# Altium PCB Control.PcbDoc (part 1 of 2)
Units mm, origin at the board's own origin, x right, y up, seen from the top; angles counter-clockwise.
Board outline 30.5 x 82 mm, 2 copper layers (Top Layer, Bottom Layer), stack 1.071 mm thick; 79 components, 65 nets, 365 pads, 467 vias.
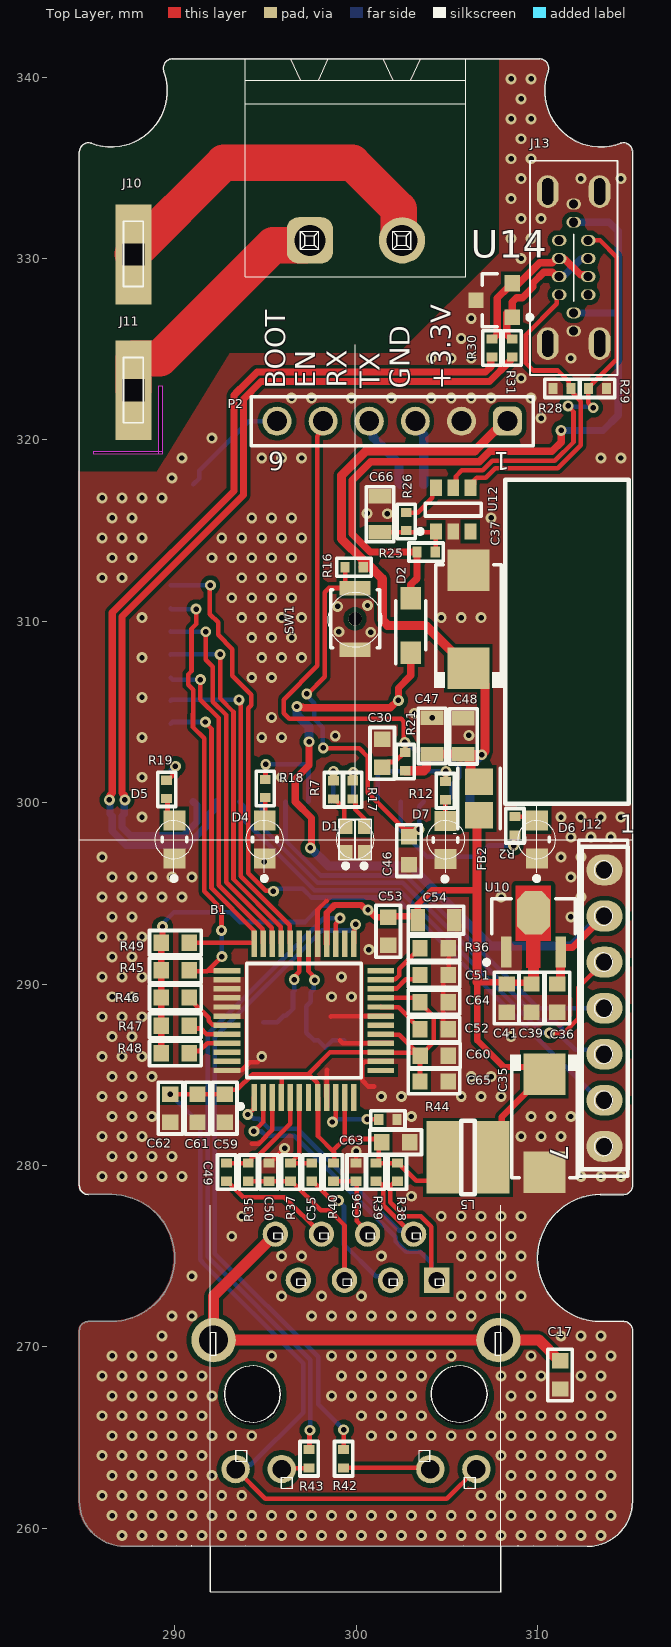
[diagram p0: Top Layer view]
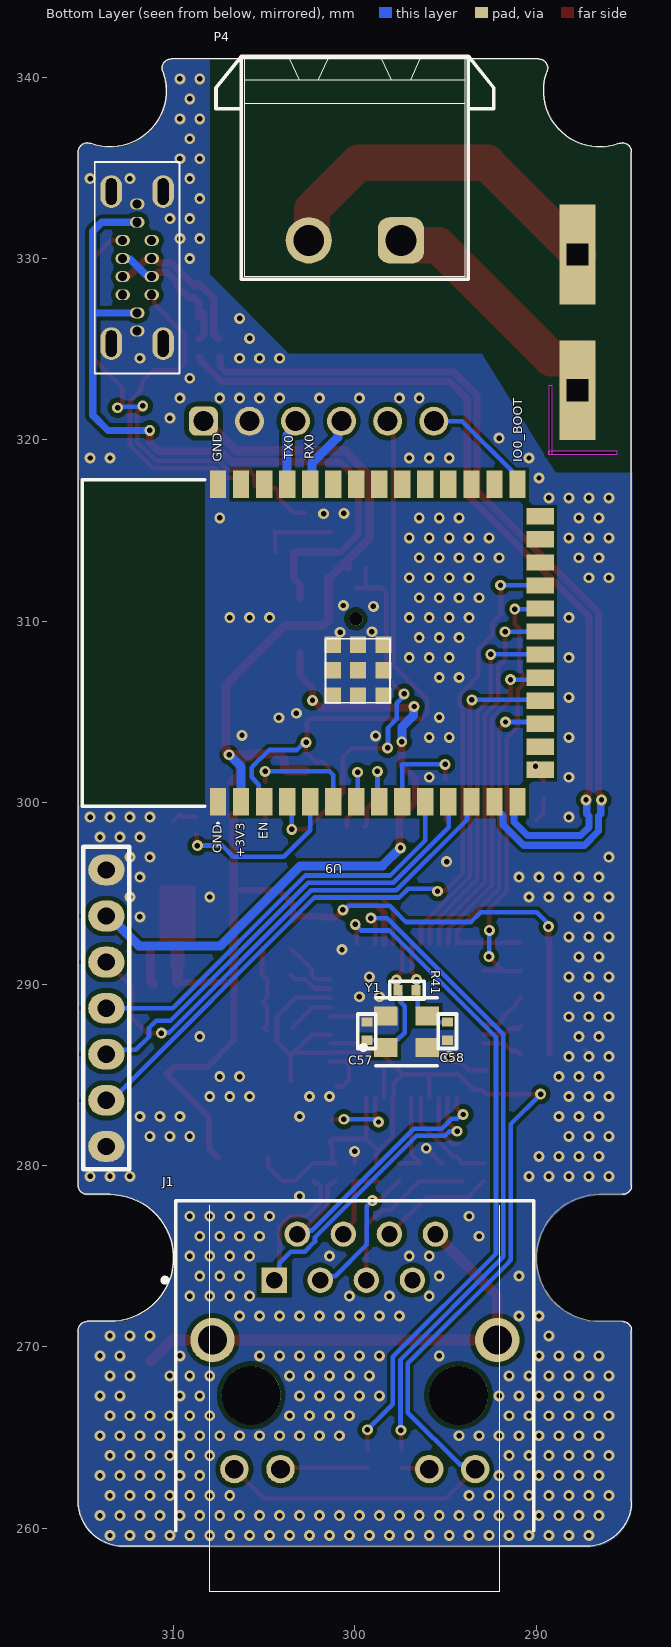
[diagram p1: Bottom Layer view, seen from below]
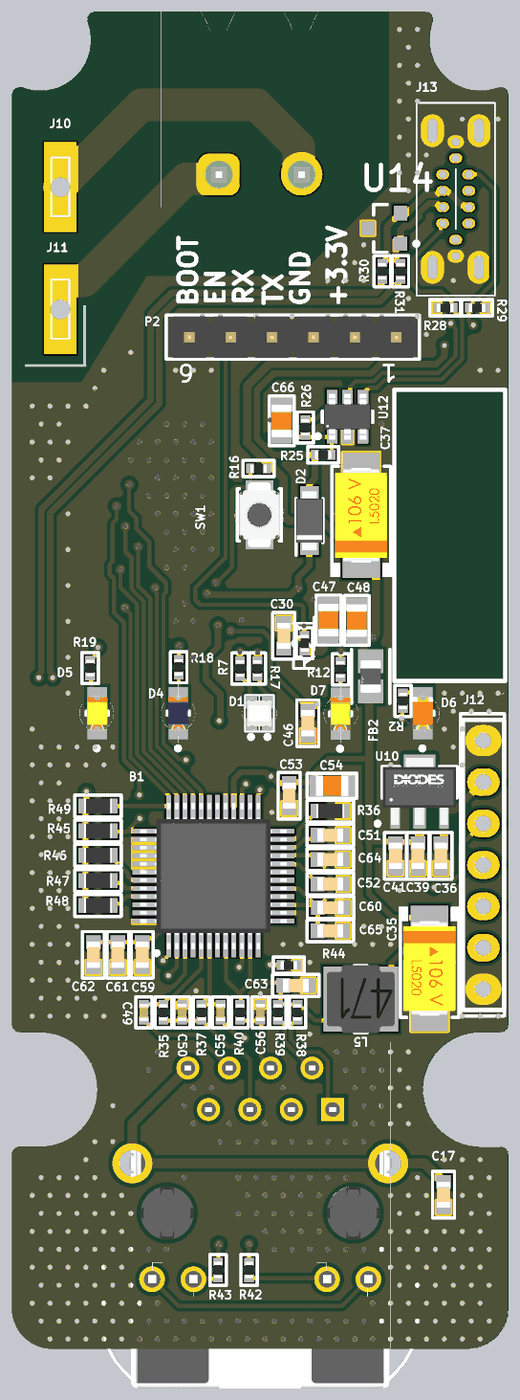
[diagram p3: 3D render of the assembled board from above, using the file's embedded part models]
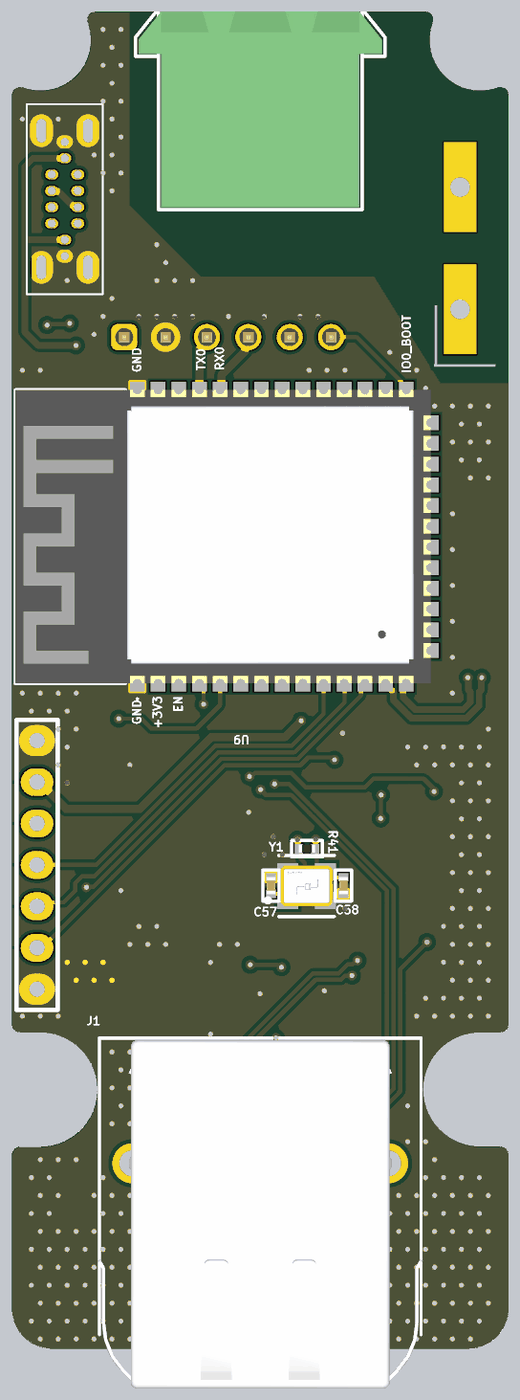
[diagram p4: 3D render of the assembled board from below, using the file's embedded part models]

## Layer stack, top to bottom
Top Solder: solder mask 0.0102, Solder Resist, Dk 3.5
Top Layer: signal copper 0.0356
Dielectric 1: dielectric 1, FR-4, Dk 4.8
Bottom Layer: signal copper 0.0356
Bottom Solder: solder mask 0.0102, Solder Resist, Dk 3.5

## Board outline
284.75,270.9 cw(c285.25,270.9) 285.25,271.4 286.5,271.4 ccw(c286.5,274.9) 286.5,278.4 285.25,278.4 cw(c285.25,278.9) 284.75,278.9 284.75,335.874 cw(c285.25,335.874) 285.424,336.343 ccw(c286.5,339.25) 289.407,340.326 cw(c289.876,340.5) 289.876,341 310.124,341 cw(c310.124,340.5) 310.593,340.326 ccw(c313.5,339.25) 314.576,336.343 cw(c314.75,335.874) 315.25,335.874 315.25,278.9 cw(c314.75,278.9) 314.75,278.4 313.5,278.4 ccw(c313.5,274.9) 313.5,271.4 314.75,271.4 cw(c314.75,270.9) 315.25,270.9 315.25,261.5 cw(c312.75,261.5) 312.75,259 287.25,259 cw(c287.25,261.5) 284.75,261.5
cut-out: 289.331,319.203 285.548,319.203 285.548,319.38 289.331,319.38
cut-out: 289.129,319.203 289.129,322.986 289.306,322.986 289.306,319.203

## Design rules (kind name [scope] priority, off if disabled: settings)
Clearance Clearance_DiffPairs [All] p1: gap=0.254 ignorepadtopadclearanceinfootprint=FALSE except(0.1: Arc-Arc Arc-Track Track-Track; 0.15: Arc-SMDPad Arc-THPad Track-SMDPad Track-THPad SMDPad-SMDPad; 0.2: Arc-Fill Arc-Poly Arc-Region Track-Fill Track-Poly Track-Region SMDPad-Fill SMDPad-Poly SMDPad-Region)
Clearance Clearance_1 [All] p2: gap=0.254 ignorepadtopadclearanceinfootprint=FALSE except(0.15: Arc-Arc Arc-Track Arc-SMDPad Arc-THPad Track-Track Track-SMDPad Track-THPad SMDPad-SMDPad; 0.2: Arc-Fill Arc-Poly Arc-Region Track-Fill Track-Poly Track-Region SMDPad-Fill SMDPad-Poly SMDPad-Region)
ComponentClearance [All] p1: gap=-10 collisioncheckmode=3 verticalgap=0.254 showdistances=FALSE
DiffPairsRouting DiffPairsRouting_2 [InDifferentialPair('TX')] p1: maxlimit=0.127 minlimit=0.127 mostfreqgap=0.127 toplayer_minwidth=0.257 toplayer_maxwidth=0.257 toplayer_prefwidth=0.257 bottomlayer_minwidth=0.257 bottomlayer_maxwidth=0.257 bottomlayer_prefwidth=0.257 impedanceprofiledriven=TRUE impedanceprofileid={17FF99D6-841A-44A6-B72D-4877BCBBE8D0} impedanceprofilevalue=100.000000 maxuncoupledlength=12.7
DiffPairsRouting DiffPairsRouting_1 [InDifferentialPair('D')] p2: maxlimit=0.127 minlimit=0.127 mostfreqgap=0.127 toplayer_minwidth=0.403 toplayer_maxwidth=0.403 toplayer_prefwidth=0.403 bottomlayer_minwidth=0.403 bottomlayer_maxwidth=0.403 bottomlayer_prefwidth=0.403 impedanceprofiledriven=TRUE impedanceprofileid={67F76D44-EA98-4726-9E93-E288EFCD1E18} impedanceprofilevalue=90.000000 maxuncoupledlength=12.7
DiffPairsRouting [InDifferentialPair('USB_D')] p3: maxlimit=0.127 minlimit=0.127 mostfreqgap=0.127 toplayer_minwidth=0.403 toplayer_maxwidth=0.403 toplayer_prefwidth=0.403 bottomlayer_minwidth=0.403 bottomlayer_maxwidth=0.403 bottomlayer_prefwidth=0.403 impedanceprofiledriven=TRUE impedanceprofileid={67F76D44-EA98-4726-9E93-E288EFCD1E18} impedanceprofilevalue=90.000000 maxuncoupledlength=12.7
HoleSize [All] p1: absolutevalues=TRUE maxlimit=4 minlimit=0.025 maxpercent=80.000 minpercent=20.000
Length USB_Max_Lenght [InNet('D_P')] p1: maxlimit=100 minlimit=0
MatchedLengths USB [InDifferentialPair('USB_D')] p1: tolerance=25.4 checknetsindiffpair=FALSE checkdiffpairvsdiffpair=TRUE checkxsignals=TRUE checkothers=TRUE
MinimumSolderMaskSliver [All] p1: minsoldermaskwidth=0.15
PlaneClearance [All] p1: clearance=0.25
PlaneConnect [All] p1: planeconnectstyle=Direct reliefexpansion=0.508 reliefentries=4 reliefconductorwidth=0.254 reliefairgap=0.254
PolygonConnect [All] p1: connectstyle=Direct reliefconductorwidth=0.254 reliefentries=4 polygonreliefangle="90 Angle" airgapwidth=0.254
RoutingVias [All] p1: holewidth=0.3 width=0.6 viastyle="Through Hole" minholewidth=0.3 minwidth=0.6 maxholewidth=0.4 maxwidth=0.8
SilkToSilkClearance [All] p1: silktosilkclearance=0.1
SilkToSolderMaskClearance [IsPad] p1: minsilkscreentomaskgap=0.1 clearancetoexposedcopper=TRUE
SolderMaskExpansion [All] p1: expansion=0.102 istentingtop=FALSE
SupplyNets "Schematic Supply Nets_2" [InNet('V_BUS')] p1: voltage=0.000
SupplyNets "Schematic Supply Nets_12" [InNet('G')] p2: voltage=0.000
SupplyNets "Schematic Supply Nets_11" [InNet('+3v3')] p3: voltage=0.000
SupplyNets "Schematic Supply Nets_10" [InNet('VCC_2')] p4: voltage=0.000
SupplyNets "Schematic Supply Nets_7" [InNet('+3V3_MCU')] p5: voltage=0.000
SupplyNets "Schematic Supply Nets_6" [InNet('GND_PE')] p6: voltage=0.000
Width [All] p1: maxlimit=2 minlimit=0.254 preferedwidth=0.5 minimp=50.000000 maximp=50.000000 favimp=50.000000
22 further rules are at their usual default settings.

## Classes and differential pairs
differential pair RXN: +RXN_P -RXN_N
differential pair D: +D_P -D_N
differential pair USB_D: +USB_D_P -USB_D_N
differential pair TX: +TX_P -TX_N
differential pair RX: +RX_P -RX_N

## Components (designator, comment, footprint, x,y, rotation, side; value= is the part's Value field where it differs from the comment)
B1 "W5500" QFP50P900X900X160-48N 297.129,287.985 r90 top
C17 "22nF" CAP-0603 311.252,268.453 r90 top
C30 "2.2uF" CAP-0603 301.447,302.717 r270 top
C35 "100uF 16V" CAP-TAN-C 310.388,282.321 r270 top
C36 "0.1uF" CAP-0603 311.099,289.23 r90 top
C37 "100uF_16V" CAP-TAN-C 306.2,310.109 r90 top
C39 "2.2uF" CAP-0603 309.677,289.23 r90 top
C41 "0.1uF" CAP-0603 308.305,289.23 r90 top
C46 "0.1uF" CAP-0603 302.92,297.358 r90 top
C47 "10uF" CAP-0805 304.19,303.682 r270 top
C48 "0.1uF" CAP-0805 305.918,303.657 r270 top
C49 "6.8nF" CAP-0402 292.862,279.629 r90 top
C50 "10nF" CAP-0402 295.199,279.629 r270 top
C51 "10nF" CAP-0603 304.303,290.5 r0 top locked
C52 "4.7uF" CAP-0603 304.303,287.505 r0 top locked
C53 "0.1uF" CAP-0603 301.777,292.913 r90 top
C54 "10uF" CAP-0805 304.409,293.523 r180 top
C55 "6.8nF" CAP-0402 297.561,279.629 r90 top
C56 "22nF" CAP-0402 299.999,279.629 r270 top
C57 "18pF" CAP-0402 299.339,287.401 r270 bottom
C58 "18pF" CAP-0402 294.894,287.401 r90 bottom
C59 "0.1uF" CAP-0603 292.76,283.159 r90 top
C60 "0.1uF" CAP-0603 304.317,286.055 r180 top
C61 "0.1uF" CAP-0603 291.262,283.159 r90 top
C62 "0.1uF" CAP-0603 289.763,283.159 r90 top
C63 "0.1uF" CAP-0603 302.184,281.28 r180 top
C64 "0.1uF" CAP-0603 304.303,289.001 r180 top locked
C65 "10uF" CAP-0603 304.303,284.632 r180 top locked
C66 "1uF 50V" CAP-0805 301.32,315.9 r270 top
D1 "1615 RED-GREEN" LED_Bicolor_1615 299.949,297.967 r0 top
D2 "MBR140SFT1G" SODFL3616X98N 303.022,309.778 r90 top
D4 "LED BLUE" LED_BLUE 294.97,297.967 r90 top
D5 "LED YELLOW" LED_YELLOW 289.992,297.967 r90 top
D6 "LED RED" LED_RED 309.982,297.967 r90 top
D7 "LED GREEN" LED_GREEN 304.927,297.942 r90 top
FB2 "BLM21PG221SN1D" FP-BLM21-0_2-t0_85-e0_5-IPC_A 306.781,300.228 r270 top
J1 "HR911105A" RJ-45 300,267.25 r180 bottom locked
J10 "1.2x3.7mm" Pad_conn_1.2x3.7mm#1 287.68,330.251 r90 top locked
J11 "1.2x3.7mm" Pad_conn_1.2x3.7mm#2 287.655,322.707 r90 top locked
J12 "2.54 x 7_male_25mm" 2.54_Connector_x7_male_30mm 313.7,288.671 r270 top locked
J13 "Type-C_16p" "Type-C 16p vertical" 312,329.5 r90 top locked
L5 "33uH" Coil_4.5x4.5_mm 306.172,280.441 r180 top
P2 "61300611121" 61300611121 302,321.031 r180 top
P4 "691305540002" 691305540002 300,335 r0 bottom locked
R2 "330" RES-0402 308.762,298.729 r270 top
R7 "330" RES-0402 298.755,300.711 r90 top
R12 "330" RES-0402 304.927,300.66 r90 top
R16 "10K" RES-0402 299.898,312.979 r0 top
R17 "330" RES-0402 299.822,300.711 r90 top
R18 "330" RES-0402 294.996,300.787 r90 top
R19 "330" RES-0402 289.56,300.736 r90 top
R21 "100K" RES-0402 302.717,302.26 r270 top
R25 "1K" RES-0402 303.868,313.817 r0 top
R26 "20K" RES-0402 302.768,315.493 r90 top
R28 "5.1K" RES-0402 311.353,322.834 r180 top
R29 "5.1K" RES-0402 313.309,322.834 r0 top
R30 "22R" RES-0402 307.492,325.069 r90 top
R31 "22R" RES-0402 308.61,325.069 r90 top
R35 "82R 1%" RES-0402 294.056,279.629 r270 top
R36 "10K" RES-0603 304.303,291.973 r0 top locked
R37 "82R 1%" RES-0402 296.393,279.629 r90 top
R38 "50R 1%" RES-0402 302.285,279.629 r90 top
R39 "50R 1%" RES-0402 301.092,279.629 r90 top
R40 "10R 1%" RES-0402 298.755,279.629 r270 top
R41 "1M" RES-0402 297.129,289.662 r0 bottom
R42 "510" RES-0402 299.314,263.83 r90 top
R43 "510" RES-0402 297.409,263.83 r90 top
R44 "12.4К" RES-0402 301.752,282.524 r180 top
R45 "10K" RES-0603 290.043,290.754 r0 top
R46 "10K" RES-0603 290.043,289.255 r0 top
R47 "10K" RES-0603 290.043,287.706 r0 top
R48 "10K" RES-0603 290.043,286.182 r0 top
R49 "10K" RES-0603 290.043,292.278 r0 top
SW1 "B3U-1000P" FP-B3U-1000P-B-MFG 299.949,310.134 r270 top
U9 "ESP32-S3_WROOM-1  N16R8" ESP32S3WROOM1N16R8 302.283,308.8 r90 bottom locked
U10 "AMS1117-3.3" SOT-89 309.778,293.548 r0 top
U12 "CH221K" SOT-23-6 305.359,316.154 r90 top
U14 "PESD5V0S2BT" PRKT-SOT23-3_V 307.61,327.702 r180 top
Y1 "ABM8-25.000MHZ-D1X-T" FP-ABM8 297.155,287.376 r180 bottom

## Footprints (in the part's own frame and the unit in brackets; to place one, negate y for a bottom-side part, rotate by r counter-clockwise, add the part's x,y. Pads: shape width x height; smd on the part's side, far side on the other; paste and mask are expansions set on the pad)
2.54_Connector_x7_male_30mm [mm] "2.54_Connector_x7_male_30mm"
  oval 1.7x2 hole 0.95: 1(-7.62,0) 2(-5.08,0) 3(-2.54,0) 4(0,0) 5(2.54,0) 6(5.08,0) 7(7.62,0)
  silkscreen extent -8.89,-1.27 8.89,1.27, body extent -8.89,-1.27 8.89,1.27, height 2
61300611121 [mm] "Pin Header, pitch 2.54 mm, THT, Vertical, single row, 6p"
  rrect50% 1.6x1.6 hole 1.1: 1(-6.35,0)
  round 1.6 hole 1.1: 2(-3.81,0) 3(-1.27,0) 4(1.27,0) 5(3.81,0) 6(6.35,0)
  silkscreen extent -7.77,-1.35 7.77,1.35, body extent -7.62,-1.27 7.62,1.27, height 8.57
691305540002 [mm] "5,08mm - PCB Header Horizontal Entry with Plastic Latches - 02p"
  rrect50% 2.55x2.55 hole 1.7: 1(-2.54,4)
  round 2.55 hole 1.7: 2(2.54,4)
  silkscreen extent -7.65,-6.15 7.65,6.15, body extent -7.48,-6 7.48,6, height 8.63
CAP-0402 [mm]
  rect 0.5x0.6 smd: 1(-0.5,0) 2(0.5,0)
  silkscreen extent -0.95,-0.5 0.95,0.5, body extent -0.52,-0.27 0.53,0.28, height 0.55
CAP-0603 [mm]
  rect 0.85x0.9 smd: 1(-0.775,0) 2(0.775,0)
  silkscreen extent -1.43,-0.67 1.43,0.67, body extent -0.8,-0.4 0.8,0.4, height 0.8
CAP-0805 [mm]
  rect 0.8x1.25 smd mask+0.015: 1(-1,0) 2(1,0)
  silkscreen extent -1.52,-0.76 1.52,0.76, body extent -1,-0.62 1,0.63, height 0.8
CAP-TAN-C [mm]
  rect 2.3x2.3 smd: 1(-2.7,0) 2(2.7,0)
  silkscreen extent -3.8,-1.9 3,1.9, body extent -2.9,-1.6 2.9,1.6, height 2.6
Coil_4.5x4.5_mm [mm]
  rect 1.8x4 smd: 1(-1.397,0) 2(1.397,0)
  silkscreen extent -0.38,-2.03 0.38,2.03, body extent -2.07,-2.07 2.07,2.07, height 2.8
ESP32S3WROOM1N16R8 [mm]
  rect 1.5x0.9 smd: 1(-8.75,5.26) 2(-8.75,3.99) 3(-8.75,2.72) 4(-8.75,1.45) 5(-8.75,0.18) 6(-8.75,-1.09) 7(-8.75,-2.36) 8(-8.75,-3.63) 9(-8.75,-4.9) 10(-8.75,-6.17) 11(-8.75,-7.44) 12(-8.75,-8.71) 13(-8.75,-9.98) 14(-8.75,-11.25) 27(8.75,-11.25) 28(8.75,-9.98) 29(8.75,-8.71) 30(8.75,-7.44) 31(8.75,-6.17) 32(8.75,-4.9) 33(8.75,-3.63) 34(8.75,-2.36) 35(8.75,-1.09) 36(8.75,0.18) 37(8.75,1.45) 38(8.75,2.72) 39(8.75,3.99) 40(8.75,5.26)
  rect 0.9x1.5 smd: 15(-6.985,-12.5) 16(-5.715,-12.5) 17(-4.445,-12.5) 18(-3.175,-12.5) 19(-1.905,-12.5) 20(-0.635,-12.5) 21(0.635,-12.5) 22(1.905,-12.5) 23(3.175,-12.5) 24(4.445,-12.5) 25(5.715,-12.5) 26(6.985,-12.5)
  rect 0.9x0.9 smd: 41(-1.5,-2.46) 42(-2.9,-1.06) 43(-2.9,-2.46) 44(-2.9,-3.86) 45(-1.5,-3.86) 46(-0.1,-3.86) 47(-0.1,-2.46) 48(-0.1,-1.06) 49(-1.5,-1.06)
  silkscreen extent -10,5.21 9,12.75, body extent -9,-12.75 9,12.75, height 3.25
FP-ABM8 [mm] "FP-ABM8"
  rect 1.3x1.05 smd paste+0 mask+0: 1(-1.15,-0.875) 2(1.15,-0.875) 3(1.15,0.875) 4(-1.15,0.875)
  silkscreen extent -2.5,-1.88 1.7,1.88, body extent -1.6,-1.25 1.6,1.25, height 0.8
FP-B3U-1000P-B-MFG [mm]
  rect 0.8x1.7 smd paste+0 mask+0: 1(-1.7,0) 2(1.7,0)
  round 0.75 hole 0.75 unplated paste-2539.97 mask+0: ""(0,0)
  silkscreen extent -1.6,-1.35 1.6,1.35, body extent -2.2,-1.45 2.2,1.45, height 0.25
FP-BLM21-0_2-t0_85-e0_5-IPC_A [mm]
  rect 1.455x1.556 smd paste+0 mask+0: 1(-0.926,0) 2(0.926,0)
  silkscreen extent -1.65,-1.18 1.65,1.18, body extent -1,-0.63 1,0.63, height 1.05
LED_Bicolor_1615 [mm] "LED_Bicolor_1615"
  rect 0.7x0.8 smd mask+0: 1(-0.5,0.7) 2(0.5,0.7) 3(0.5,-0.7) 4(-0.5,-0.7)
  silkscreen extent -0.89,-1.57 0.89,1.12, body extent -0.75,-0.8 0.75,0.8, height 0.55
LED_BLUE [mm]
  rect 1.1x1.2 smd paste+0 mask+0: 1(1.05,0) 2(-1.05,0)
  silkscreen extent -2.27,-0.67 0.13,0.67, body extent -1,-0.63 1,0.63, height 0.8
LED_GREEN [mm]
  rect 1.1x1.2 smd paste+0 mask+0: 1(1.05,0) 2(-1.05,0)
  silkscreen extent -2.27,-0.67 0.13,0.67, body extent -1,-0.63 1,0.63, height 0.8
LED_RED [mm]
  rect 1.1x1.2 smd paste+0 mask+0: 1(1.05,0) 2(-1.05,0)
  silkscreen extent -2.27,-0.67 0.13,0.67, body extent -1.7,-0.77 1.7,0.77, height 0.25
LED_YELLOW [mm]
  rect 1.1x1.2 smd paste+0 mask+0: 1(1.05,0) 2(-1.05,0)
  silkscreen extent -2.27,-0.67 0.13,0.67, body extent -1,-0.63 1,0.63, height 0.8
Pad_conn_1.2x3.7mm#1 [mm]
  rect 5.5x2 hole 1.2 square: 1(-0.025,-0.051)
Pad_conn_1.2x3.7mm#2 [mm]
  rect 5.5x2 hole 1.2 square: 1(0.026,-0.076)
PRKT-SOT23-3_V [mm] "SOT23, 3-Leads, Body 2.92x1.3mm, Pitch 0.94mm"
  rect 0.84x0.84 smd: 1(-1,0.94) 3(1,0)
  rect 0.84x0.9 smd: 2(-1,-0.94)
  silkscreen extent -2.09,-1.46 0.65,1.46, body extent -0.65,-1.46 0.65,1.46, height 1.17
QFP50P900X900X160-48N [mm]
  rect 1.475x0.3 smd: 1(-4.238,2.75) 2(-4.238,2.25) 3(-4.238,1.75) 4(-4.238,1.25) 5(-4.238,0.75) 6(-4.238,0.25) 7(-4.238,-0.25) 8(-4.238,-0.75) 9(-4.238,-1.25) 10(-4.238,-1.75) 11(-4.238,-2.25) 12(-4.238,-2.75) 25(4.238,-2.75) 26(4.238,-2.25) 27(4.238,-1.75) 28(4.238,-1.25) 29(4.238,-0.75) 30(4.238,-0.25) 31(4.238,0.25) 32(4.238,0.75) 33(4.238,1.25) 34(4.238,1.75) 35(4.238,2.25) 36(4.238,2.75)
  rect 0.3x1.475 smd: 13(-2.75,-4.238) 14(-2.25,-4.238) 15(-1.75,-4.238) 16(-1.25,-4.238) 17(-0.75,-4.238) 18(-0.25,-4.238) 19(0.25,-4.238) 20(0.75,-4.238) 21(1.25,-4.238) 22(1.75,-4.238) 23(2.25,-4.238) 24(2.75,-4.238) 37(2.75,4.238) 38(2.25,4.238) 39(1.75,4.238) 40(1.25,4.238) 41(0.75,4.238) 42(0.25,4.238) 43(-0.25,4.238) 44(-0.75,4.238) 45(-1.25,4.238) 46(-1.75,4.238) 47(-2.25,4.238) 48(-2.75,4.238)
  silkscreen extent -4.85,-3.15 3.15,3.62, body extent -4.5,-4.5 4.5,4.5, height 1.6
RES-0402 [mm]
  rect 0.5x0.6 smd: 1(-0.5,0) 2(0.5,0)
  silkscreen extent -0.95,-0.5 0.95,0.5, body extent -0.5,-0.25 0.5,0.25, height 0.35
RES-0603 [mm]
  rect 0.85x0.9 smd: 1(-0.775,0) 2(0.775,0)
  silkscreen extent -1.43,-0.67 1.43,0.67, body extent -0.85,-0.45 0.85,0.45, height 0.55
RJ-45 [mm] "RJ-45  connector"
  rect 1.4x1.4 hole 0.9 paste-2539.97 mask+0: 1(-4.445,6.425)
  round 1.4 hole 0.9 paste-2539.97 mask+0: 2(-3.175,8.965) 3(-1.905,6.425) 4(-0.635,8.965) 5(0.635,6.425) 6(1.905,8.965) 7(3.175,6.425) 8(4.445,8.965)
  round 1.57 hole 1.02 paste-2539.97 mask+0: 9(-6.64,-3.985) 10(-4.1,-3.985) 11(4.1,-3.985) 12(6.64,-3.985)
  round 2.45 hole 1.6 paste-2539.97 mask+0: 13(-7.85,3.125) 14(7.85,3.125)
  round 3.25 hole 3.25 unplated paste-2539.97 mask+0: ""(-5.715,0.075) ""(5.715,0.075)
  silkscreen extent -10.6,-7.37 9.87,10.8, body extent -10,-10.68 10,10.68, height 15.75
SODFL3616X98N [mm]
  rect 1.24x1.12 smd: 1(-1.5,0) 2(1.5,0)
  silkscreen extent -2.12,-0.82 1.35,0.82, body extent -1.8,-0.82 1.8,0.82, height 0.98
SOT-23-6 [mm] "SOT-23-6"
  rect 0.9x0.65 smd: 1(-1.2,0.95) 2(-1.2,0) 3(-1.2,-0.95) 4(1.2,-0.95) 5(1.2,0) 6(1.2,0.95)
  silkscreen extent -1.32,-1.55 0.35,1.95, body extent -1.4,-1.45 1.4,1.45, height 1.2
SOT-89 [mm]
  rect 0.58x1.73 smd paste+0 mask+0: 1(-1.5,-1.781) 3(1.5,-1.781)
  oct 1.827x2.394 smd paste+0 mask+0: 2(0,0.381)
  Top Layer region: -0.38,-2.646 -0.38,-1.146 -0.967,-1.146 -0.967,1.884 0.967,1.884 0.967,-1.146 0.38,-1.146 0.38,-2.646
  silkscreen extent -2.7,-2.47 2.3,1.15, body extent -2.4,-2.75 2.4,1.98, height 0.25
"Type-C 16p vertical" [mm] "Type-C 16p vertical"
  oval 0.6x0.8 hole 0.5: A1/B12(-3.5,0) A4/B9(-2.5,0) A5(-1.5,0.8) A6(-0.5,0.8) A7(0.5,0.8) A8(1.5,0.8) A12/B1(3.5,0) B4/A9(2.5,0) B5(1.5,-0.8) B6(0.5,-0.8) B7(-0.5,-0.8) B8(-1.5,-0.8)
  oval 1.8x1.2 hole 0.6 slot 1.462 at 0 deg: MNT1(-4.191,1.43) MNT2(-4.191,-1.43) MNT3(4.191,-1.43) MNT4(4.191,1.43)
  silkscreen extent -5.92,-2.41 5.89,2.41, body extent -6,-2.5 6,2.5, height 13.7

## Part data
B1: "Ethernet ICs 3in1 Enet Controller TCP/IP +MAC+PHY", Manufacturer_Name="Wiznet Technology", Arrow Part Number=W5500, Arrow Price/Stock=https://www.arrow.com/en/products/w5500/wiznet?utm_currency=USD&region=nac, Datasheet Link=https://docs.wiznet.io/img/products/w5500/W5500_ds_v110e.pdf, Geometry.Height=1.6mm, Manufacturer_Part_Number=W5500
C17 C30 C39 C41 C46 C47 C48 C49 C50 C51 C52 C53 C54 C55 C56 C57 C58 C59 C60 C61 C62 C63 C64 C65 C66: library part CAP-NON-POLAR
C35: library part CAP-POLAR, "100uF 16V  size-C"
C36: library part CAP-NON-POLAR, "0.1uF 16V"
C37: library part CAP_POL_SMD, "100uF_16V  size-C"
D1: library part "LED Bicolor", "1615 bicolor SMD LED 2 colors Red+GREEN /  / DY-S161506URUGC-T10-4T-03"
D2: "MBR140SFT1G / DIODE SCHOTTKY 40V 1A SOD123L"
D4: library part LED, "XL-2012UBC XINGLIGHT 0805 LED BLUE", Manufacturer_Name="Wurth Elektronik", Manufacturer_Part_Number=151031YS06000, Mouser Part Number=710-151031YS06000, Datasheet Link=https://katalog.we-online.de/led/datasheet/151031YS06000.pdf, Geometry.Height=5.5mm, Mouser Price/Stock=https://www.mouser.co.uk/ProductDetail/Wurth-Elektronik/151031YS06000?qs=LlUlMxKIyB3xSYYW%252BcuBiQ%3D%3D
D5: library part LED, "XL-2012UYC  XINGLIGHT 0805 LED YELLOW", Manufacturer_Name="Wurth Elektronik", Manufacturer_Part_Number=151031YS06000, Mouser Part Number=710-151031YS06000, Datasheet Link=https://katalog.we-online.de/led/datasheet/151031YS06000.pdf, Geometry.Height=5.5mm, Mouser Price/Stock=https://www.mouser.co.uk/ProductDetail/Wurth-Elektronik/151031YS06000?qs=LlUlMxKIyB3xSYYW%252BcuBiQ%3D%3D
D6: library part LED, "XL-2012SURC   XINGLIGHT  0805  LED RED", Manufacturer_Name="Wurth Elektronik", Manufacturer_Part_Number=151031YS06000, Mouser Part Number=710-151031YS06000, Datasheet Link=https://katalog.we-online.de/led/datasheet/151031YS06000.pdf, Geometry.Height=5.5mm, Mouser Price/Stock=https://www.mouser.co.uk/ProductDetail/Wurth-Elektronik/151031YS06000?qs=LlUlMxKIyB3xSYYW%252BcuBiQ%3D%3D
D7: library part LED, "XL-2012SYGC-06  XINGLIGHT  0805  LED GREEN", Manufacturer_Name="Wurth Elektronik", Manufacturer_Part_Number=151031YS06000, Mouser Part Number=710-151031YS06000, Datasheet Link=https://katalog.we-online.de/led/datasheet/151031YS06000.pdf, Geometry.Height=5.5mm, Mouser Price/Stock=https://www.mouser.co.uk/ProductDetail/Wurth-Elektronik/151031YS06000?qs=LlUlMxKIyB3xSYYW%252BcuBiQ%3D%3D
FB2: "Chip Ferrite Bead, 0805, 220Ω @ 100MHz, 0.045Ω, 25%, 2A"
J1: library part HRK1-1B72F09
J10 J11: library part Klema_15_A
J12: library part 2.54_Connector_x7_male_25mm, "2.54_Connector_x7_male_25mm"
J13: "Type-C_16p  TYPE-C16P female socket vertical plug-in patch 8.8 mm  /  / https://www.aliexpress.com/item/1005012731556882.html?spm=a2g0o.cart.0.0.a5d038da7FoSd6&mp=1&pdp_npi=6%40dis%21UAH%21UAH+257.01%21UAH+231.29%21%21UAH+223.44%21%21%21%402103842a17955063158303339e1049%2112000059158355455%21ct%21UA%214339914066%21%211%210%21"
L5: library part Coil
P2: "WR-PHD Pin Header, THT, Vertical, pitch 2.54mm, 1 Row, 6P", Contact Resistance=20mΩ, Manufacturer="Wurth Elektronik", Operating Temperature Max=105°C, Operating Temperature Min=-40°C, Rated Current=3A, Withstanding Voltage=500V, Working Voltage=250V, Category="Board-to-Board Connectors", ComponentLink1Description="Website Link", ComponentLink1URL=https://www.we-online.com/redexpert/article/61300611121?ad, ComponentLink2Description="Datasheet Link", ComponentLink2URL=https://www.we-online.com/redexpert/spec/61300611121?ad, Gender="Pin Header", Manufacturer Part Number=61300611121, Match Code=WR-PHD, Mount="Through Hole", Number of Pins=6, Number of Rows=1, Orientation=Vertical, Packaging=Bag, Pitch=2.54mm
P4: "WR-TBL Series 3055 PCB Header Horizontal Entry with Plastic Latches, THT, pitch 5.08mm, 02p", Manufacturer="Wurth Elektronik", Operating Temperature Max=105degC, Operating Temperature Min=-40degC, Rated Current=16A, Working Voltage="300V (AC)", Application=Pluggable, ComponentLink1Description="Website Link", ComponentLink1URL=https://www.we-online.com, ComponentLink2Description="Datasheet Link", ComponentLink2URL=https://www.we-online.com/components/products/datasheet/691305540002, Lead Pitch=5.08mm, Manufacturer Part Number=691305540002, Modularity=No, Mount="Through Hole", Number of Pins=2, Number of Rows=1, Orientation=Horizontal, Packaging=Box, Product Series=WR-TBL
R2 R7 R12 R16 R17 R18 R19 R21 R25 R26 R28 R29 R30 R31 R35 R36 R37 R38 R39 R40 R41 R42 R43 R45 R46 R47 R48 R49: library part RES-CONST
R44: library part RES-CONST, "12.4К  1%"
U9: library part "ESP32-S3_WROOM-1 N16R8", "ESP32-S3_WROOM-1 N16R8"
U10: library part AMS1117
U12: "WCH CH221K /  / https://www.lcsc.com/product-detail/C5125736.html?s_z=n_q_x_CH221K&spm=wm.ssy.em.0.tz&lcsc_vid=T1ILBVxSEgBWUlIFElIIVl1eEgJYAVZUQVBaAlBUQVExVlNfQlRfXlNXQ1JfUTsOAxUeFF5JWBYZEEoKFBINSQcJGk4NBhADEA4cHktXRlVeSQwSGg0%3D"
U14: library part CMP-2000-07553-1, "TVS Array - Low capacitance bidirectional double ESD protection diode / https://www.lcsc.com/product-detail/C49338.html?s_z=n_q_PESD5V0S2BT&spm=wm.fly.bg.0.xh&lcsc_vid=T1ILBVxSEgBWUlIFElIIVl1eEgJYAVZUQVBaAlBUQVExVlNfQldfUFRWQVRbVDsOAxUeFF5JWBYZEEoKFBINSQcJGk4NBhADEA4cHktRR1NADxALGw%3D%3D", Capacitance=75pF, Case\/Package=SOT-23, Clamping Voltage=17V, Current=20uA, Manufacturer="Protek Devices", Max Operating Temperature=150degC, Min Breakdown Voltage=7.5V, Min Operating Temperature=-55degC, Package Description="3-Pin Small Outline Transistor, Body 2.92 x 1.3 mm, Pitch 0.94 mm", Package Reference=SOT23-3, Power Dissipation=600W, Voltage=12V, Working Voltage=7V, Datasheet URL=www.protekdevices.com/xyz/documents/datasheets/psm712.pdf, Datasheet Version=10/2013, Depth=1.4mm, Direction=Bidirectional, Element Configuration=Dual, Lead Free=LeadFree, Leakage Current=20uA, Length=3.04mm, Manufacturer URL=http://www.protekdevices.com/, Mounting Technology=SurfaceMount, Number of Pins=3, Packaging=TapeandReel, Radiation Hardening=No, RoHSCompliant=True
Y1: library part ABM8-25.000MHZ, "Crystal 25MHz ±10ppm 18pF SMD-4 3.2mm x 2.5mm"

## Free pads (board coordinates)
  round 0.006 on Top Overlay: 1(284.691,261.523) 1(284.691,261.523) 1(284.691,270.923) 1(284.691,270.923) 1(284.693,261.525) 1(284.693,261.525) 1(284.693,270.925) 1(284.693,270.925) 1(284.716,270.923) 1(284.716,270.923) 1(284.716,278.923) 1(284.716,278.923) 1(285.191,278.423) 1(285.191,278.423) 1(285.193,278.425) 1(285.193,278.425) 1(285.216,278.423) 1(285.216,278.423) 1(286.441,271.423) 1(286.441,271.423) 1(286.443,271.425) 1(286.443,271.425) 1(286.466,271.423) 1(286.466,271.423) 1(288.792,259.004) 1(289.348,340.35) 1(289.348,340.35) 1(289.35,340.351) 1(289.35,340.351) 1(289.373,340.35) 1(289.373,340.35) 1(290.117,259.004) 1(290.961,259.004) 1(291.941,259.023) 1(291.943,259.025) 1(291.966,259.023) 1(293.961,259.004) 1(305.961,259.004) 1(307.941,259.023) 1(307.943,259.025) 1(307.966,259.023) 1(308.961,259.004) 1(309.805,259.004) 1(311.133,259.004) 1(313.441,278.423) 1(313.441,278.423) 1(313.443,278.425) 1(313.443,278.425) 1(313.466,278.423) 1(313.466,278.423) 1(314.517,336.366) 1(314.517,336.366) 1(314.519,336.367) 1(314.519,336.367) 1(314.543,336.366) 1(314.543,336.366) 1(315.191,278.923) 1(315.191,278.923) 1(315.193,278.925) 1(315.193,278.925)
  round 0.1 on Top Overlay: 1(312.288,279.405) 1(312.288,279.405) 1(312.288,297.935) 1(312.288,297.935) 1(314.988,279.405) 1(314.988,279.405) 1(314.988,297.935) 1(314.988,297.935)

## Via types
v1: diameter 0.6, hole 0.3, Top Layer to Bottom Layer, tented both sides, 467 vias

## Nets (pads, with @x,y where several pads share a name; then routed paths per layer and width w, separated by ;. In a path a pad name is that pad's centre, name@x,y a point inside that pad or via, vN(x,y) a via of type N, cw(c..) or ccw(c..) an arc to the next point about the centre after c; other vN are vias at no path point)
+3v3: B1.28 C35.1 C39.2 C41.2 C53.2 C54.2 FB2.2 L5.1 R45.1 R46.1 R47.1 R48.1 R49.1 U10.2 | length 61
  Top Layer w0.35: R48.1@289.268,286.182 R47.1@289.268,287.706 R46.1@289.268,289.255 R45.1@289.268,290.754 R49.1@289.268,292.278 289.331,292.342 v1(289.331,293.167) ; B1.28@298.379,292.223 298.379,293.858 298.389,293.868 298.389,293.935 298.816,294.362 300.295,294.362 300.441,294.216 300.467,294.216 300.592,294.091 v1(300.66,294.091) 301.063,293.688 C53.2@301.777,293.688 ; C53.2@301.693,293.747 303.184,293.747 C54.2@303.409,293.522 303.409,294.392 304.19,295.173 306.68,295.173 ; L5.1@307.569,280.441 308.041,280.913 308.041,282.674 C35.1@310.388,285.021 309.982,285.427 308.145,285.427 306.68,286.893 306.68,290.106 308.204,290.106 C41.2@308.305,290.005 308.381,290.081 309.601,290.081 C39.2@309.677,290.005 C39.2@309.778,290.106
  Top Layer w0.5: 306.68,290.106 306.68,295.173 306.68,299.201 FB2.2@306.781,299.302
  Top Layer w0.6: C39.2@309.778,290.106 U10.2@309.778,293.929
  Bottom Layer w0.254: v1(289.331,293.167) 289.331,293.319 289.966,293.954 293.065,293.954 293.599,293.421 297.188,293.421 298.082,294.314 300.343,294.314 300.566,294.091 v1(300.66,294.091)
+3V3_MCU: C37.1 C47.2 C48.2 FB2.1 P2.1 R16.2 R21.2 U9.2 | length 40.2
  Top Layer w0.5: R16.2@300.398,312.979 300.605,313.186 301.447,312.344 301.447,310.071 301.74,309.778 303.83,309.778 C37.1@306.2,307.409 307.1,306.509 307.1,306.227 307.111,306.216 307.111,302.846 306.934,302.668 v1(306.934,302.641) 306.553,302.641 ; R16.2@300.398,313.226 300.398,313.357 299.196,314.559 299.196,318.03 300.567,319.401 306.546,319.401 307.626,320.481 307.719,320.481 308.269,321.031 P2.1@308.35,321.031 ; R21.2@302.717,301.76 303.737,301.76 303.886,301.909 303.886,302.409 304.159,302.682 C47.2@304.191,302.682 C48.2@305.654,302.682 ; C48.2@305.791,302.53 C48.2@305.918,302.657 306.324,302.251 306.324,301.899 306.329,301.893 306.329,301.606 FB2.1@306.781,301.154 ; C48.2@306.105,302.641 306.553,302.641 ; C48.2@306.299,302.387 306.553,302.641
  Bottom Layer w0.5: U9.2@306.273,300.05 306.273,301.981 v1(306.934,302.641)
D_N: J13.A7 J13.B7 R30.2 U14.2 | length 8.7
  Top Layer w0.403: R30.2@307.492,325.569 307.542,325.569 307.786,325.813 307.786,327.819 308.361,328.393 308.391,328.393 308.61,328.612 U14.2@308.61,328.642 ; U14.2@308.851,328.491 310.125,329.765 310.811,329.765 311.047,330 J13.A7@311.2,330 311.238,329.962 311.515,329.962 312.378,329.099 312.548,329.099 312.609,329.038 312.883,329.038 J13.B7@312.91,329.065
D_P: J13.A6 J13.B6 R31.2 U14.1 | length 7.9
  Top Layer w0.403: U14.1@308.316,326.981 308.316,325.813 308.56,325.569 R31.2@308.61,325.569 ; U14.1@308.61,326.762 308.61,327.605 308.845,327.841 309.175,327.841 309.76,328.425 309.76,328.65 310.345,329.235 310.811,329.235 311.047,329 J13.A6@311.2,329
  Bottom Layer w0.403: J13.A6@311.2,329 311.353,329 311.452,329.099 311.522,329.099 312.385,329.962 312.762,329.962 J13.B6@312.8,330